# Altium PCB DriveWirePCB.PcbDoc (part 1 of 3)
Units mm, origin at the board's own origin, x right, y up, seen from the top; angles counter-clockwise.
Board outline 57.5 x 124.12 mm, 4 copper layers (Top Layer, GND, PWR, Bottom Layer), stack 1.57 mm thick; 111 components, 71 nets, 388 pads, 260 vias.
Unrouted connection lines stored in the file: 101.
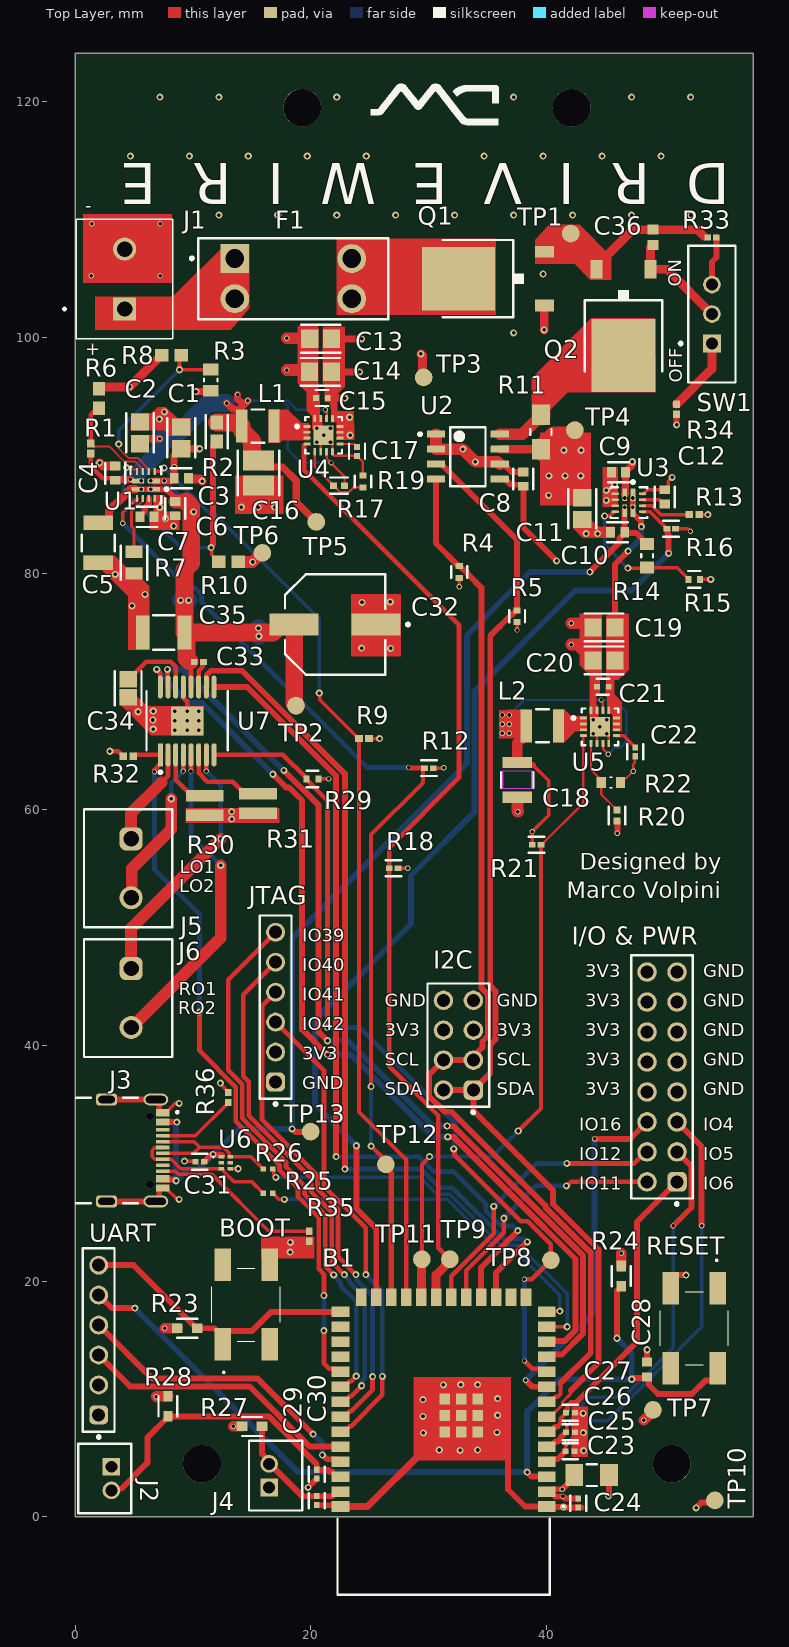
[diagram p0: Top Layer view]
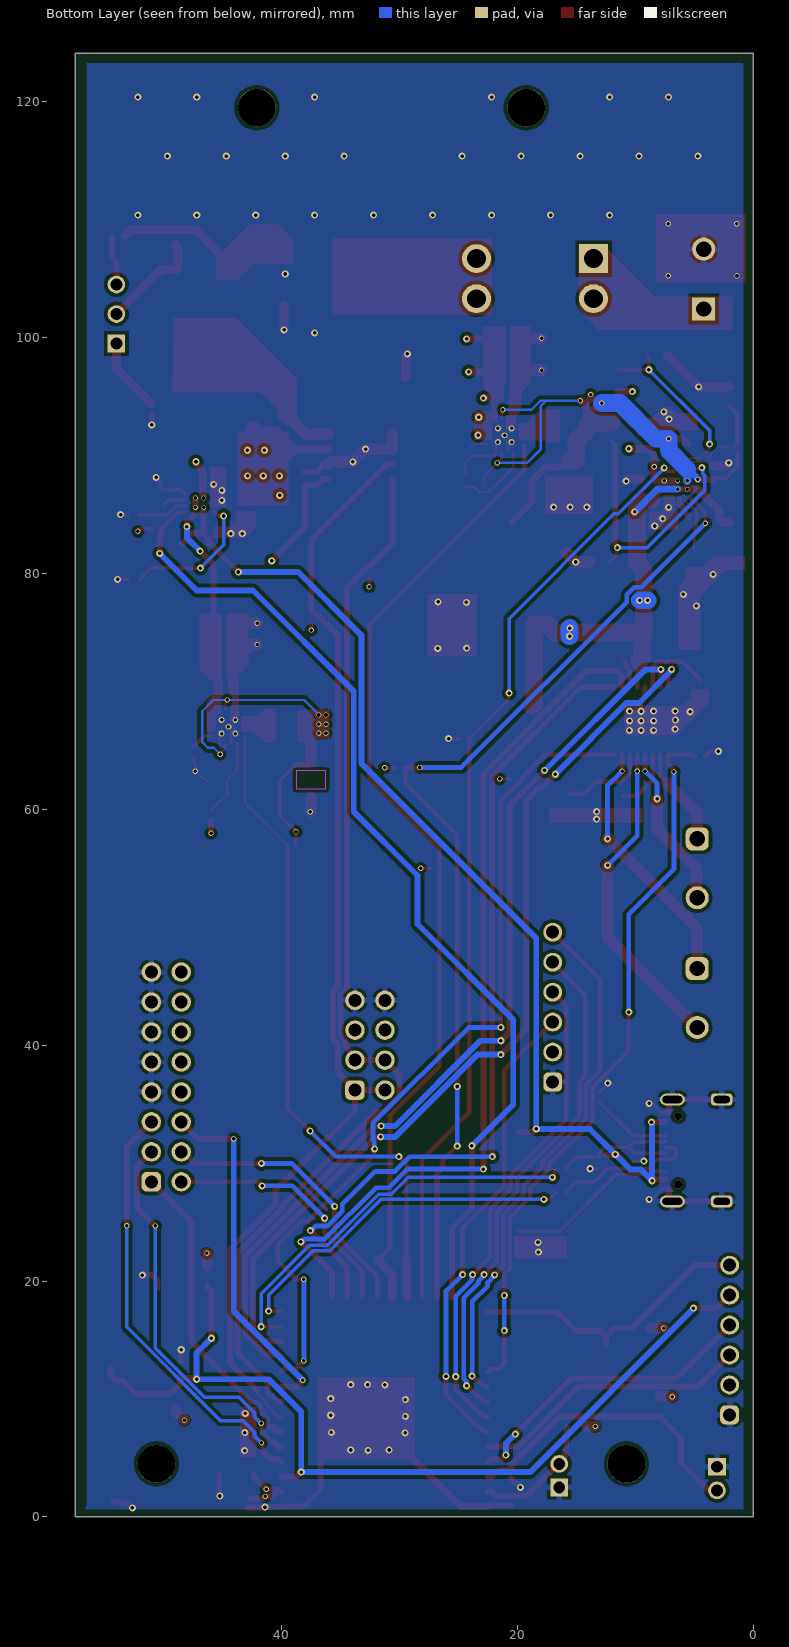
[diagram p1: Bottom Layer view, seen from below]
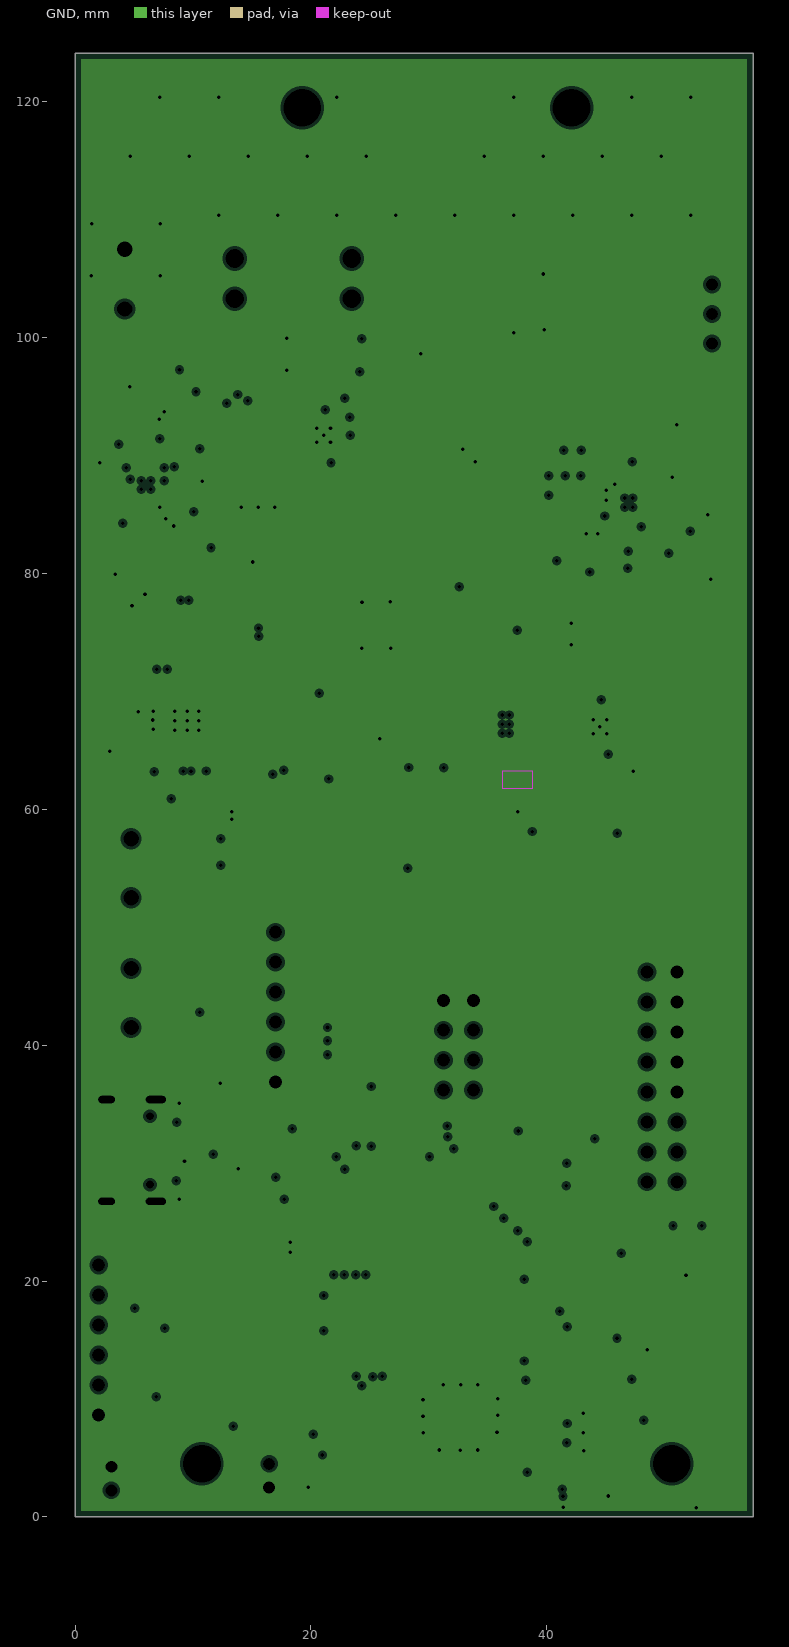
[diagram p2: GND, clearances drawn from the general rule]
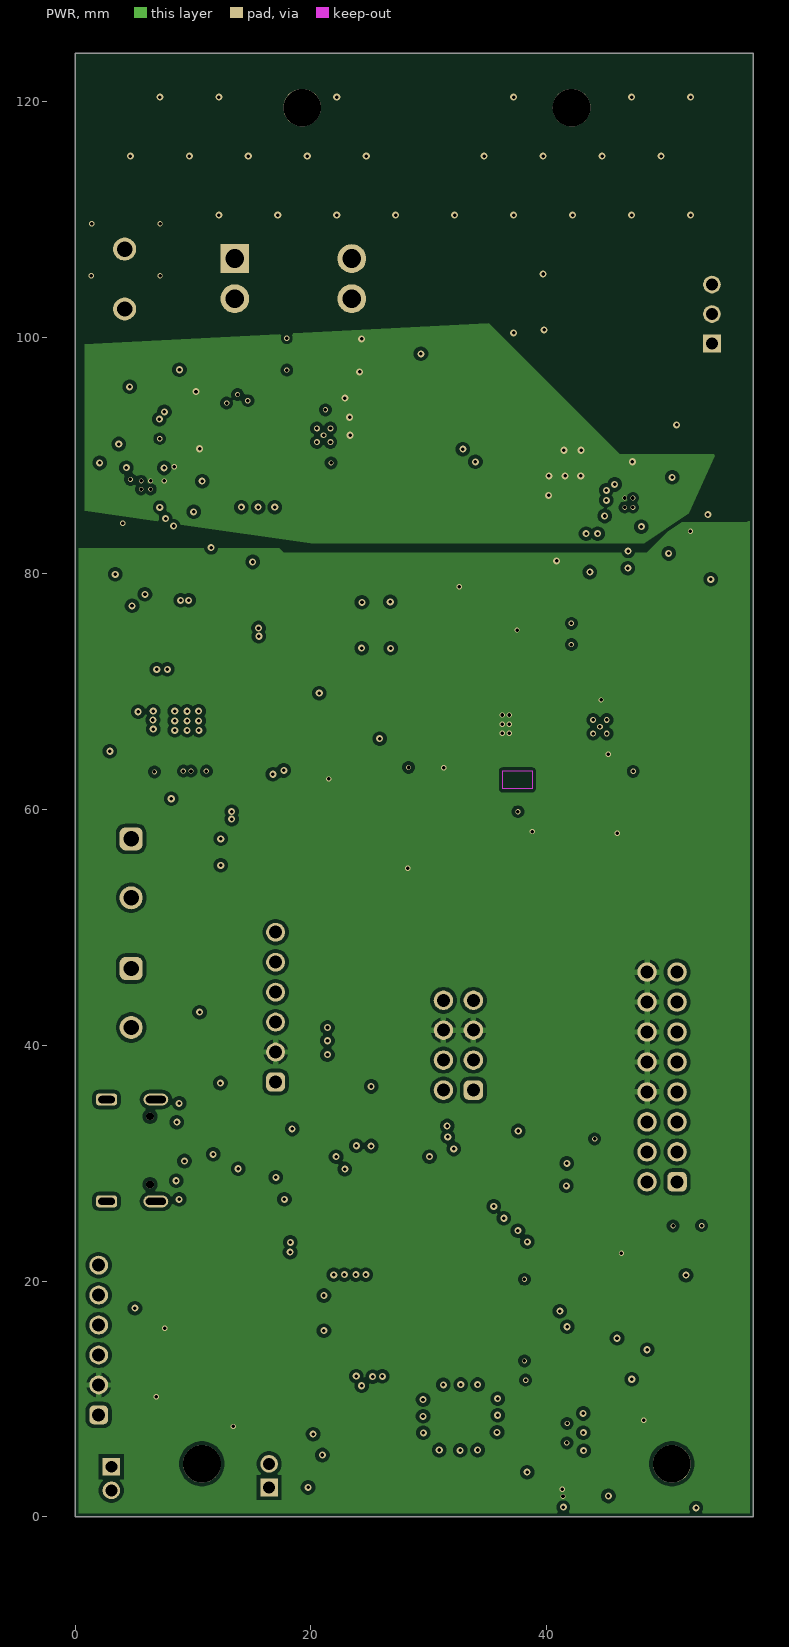
[diagram p3: PWR]
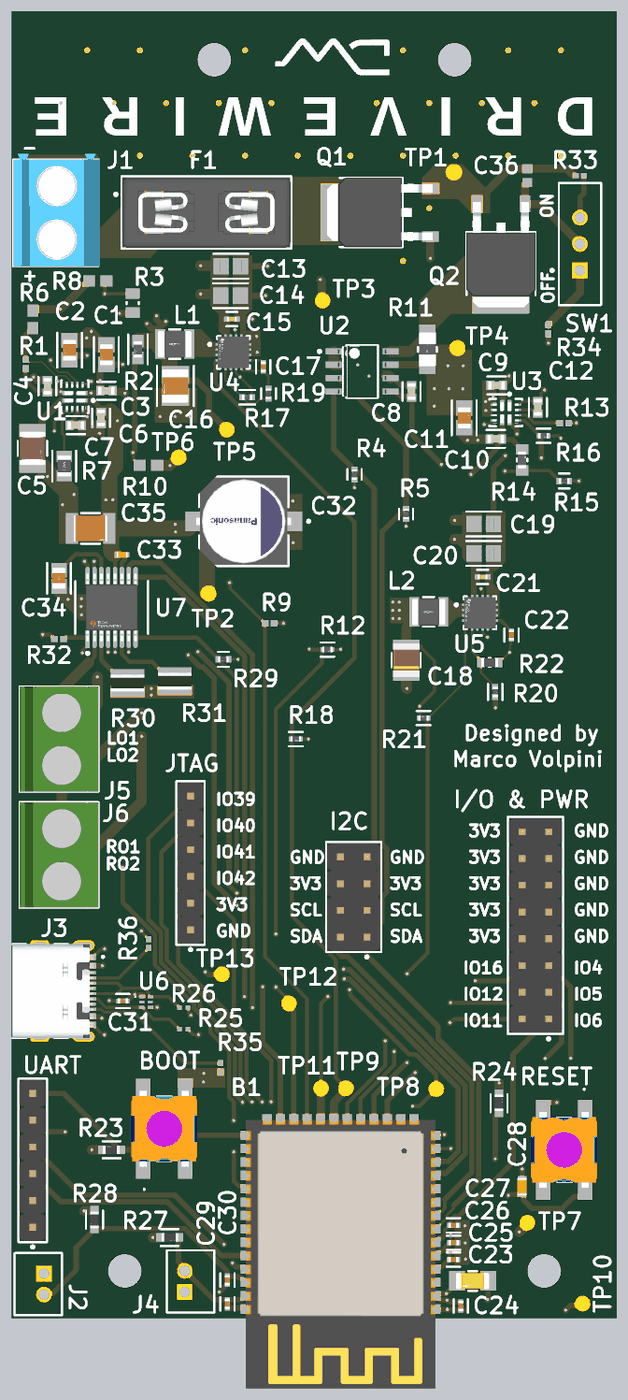
[diagram p5: 3D render of the assembled board from above, using the file's embedded part models]

## Layer stack, top to bottom
Top Solder: solder mask 0.0102, Solder Resist, Dk 3.5
Top Layer: signal copper 0.035
Dielectric 2: prepreg 0.2, PP-006, Dk 4.1
GND: plane copper 0.0175, net GND
Dielectric 1: dielectric 1.065, FR-4, Dk 4.8
PWR: signal copper 0.0175
Dielectric 3: prepreg 0.2, PP-006, Dk 4.1
Bottom Layer: signal copper 0.035
Bottom Solder: solder mask 0.0102, Solder Resist, Dk 3.5

## Board outline
0,0 0,124.125 57.5,124.125 57.5,0

## Design rules (kind name [scope] priority, off if disabled: settings)
BoardOutlineClearance [All] p1: gap=0.3 ignorepadtopadclearanceinfootprint=FALSE
Clearance PourRule [InPolygon] p1: gap=0.3 ignorepadtopadclearanceinfootprint=FALSE
Clearance [All] p2: gap=0.15 ignorepadtopadclearanceinfootprint=TRUE
HoleSize [All] p1: absolutevalues=TRUE maxlimit=6.3 minlimit=0.3 maxpercent=80.000 minpercent=20.000
HoleToHoleClearance [All] p1: gap=0.25 allowstackedmicrovias=TRUE
MinimumAnnularRing MinimumAnnularRing_via [IsVia] p1: minimumring=0.05
MinimumAnnularRing [All] p2: minimumring=0.125
MinimumSolderMaskSliver [All] p1: minsoldermaskwidth=0.1
PlaneClearance [All] p1: clearance=0.25
PlaneConnect PlaneConnect_J1 [InComponent('J1')] p1: planeconnectstyle=Direct reliefexpansion=0.508 reliefentries=4 reliefconductorwidth=0.254 reliefairgap=0.254
PlaneConnect PlaneConnect_vias [IsVia] p2: planeconnectstyle=Direct reliefexpansion=0.508 reliefentries=4 reliefconductorwidth=0.254 reliefairgap=0.254
PlaneConnect [All] p3: planeconnectstyle=Relief reliefexpansion=0.508 reliefentries=4 reliefconductorwidth=0.254 reliefairgap=0.254
PolygonConnect [All] p1: thpad.connectstyle=Relief thpad.reliefconductorwidth=0.5 thpad.reliefentries=4 thpad.polygonreliefangle="90 Angle" thpad.airgapwidth=0.254 smdpad.connectstyle=Direct smdpad.reliefconductorwidth=0.254 smdpad.reliefentries=4 smdpad.polygonreliefangle="90 Angle" smdpad.airgapwidth=0.254 via.connectstyle=Direct via.reliefconductorwidth=0.254 via.reliefentries=4 via.polygonreliefangle="90 Angle" via.airgapwidth=0.254
RoutingVias [All] p1: holewidth=0.3 width=0.6 viastyle="Through Hole" minholewidth=0.2 minwidth=0.45 maxholewidth=0.3 maxwidth=0.6
SilkToSolderMaskClearance [IsPad] p1: minsilkscreentomaskgap=0.15 clearancetoexposedcopper=TRUE
SolderMaskExpansion [All] p1: expansion=0.05 istentingtop=FALSE
SupplyNets "Schematic Supply Nets" [InNet('GND')] p1: voltage=0.000
Width Width_Power [InNetClass('POWER')] p1: maxlimit=5 minlimit=0.2 preferedwidth=1
Width [All] p2: maxlimit=1 minlimit=0.15 preferedwidth=0.5
24 further rules are at their usual default settings.

## Classes and differential pairs
net class POWER: 6V MOTOR_BUS NetJ5_1 NetJ5_2 NetJ6_1 NetJ6_2 NetL1_1 NetR30_1 NetR31_1 VBAT_BUS VBAT_FUSED VBAT_PROTECTED VBAT_RAW VBAT_SWTCH
component class Power: C1 C2 C3 C4 C5 C6 C7 C8 C36 F1 J1 Q1 Q2 R1 R2 R3 R4 R5 R6 R7 R8 R9 R10 R11 R12 R33 R34 SW1 TP1 TP2 TP3 TP4 U1 U2
component class motor_driver: C32 C33 C34 C35 J5 J6 R29 R30 R31 R32 U7
component class logic_power_mux: C9 C10 C11 C12 R13 R14 R15 R16 U3
component class ESP32: B1 BOOT C23 C24 C25 C26 C27 C28 C29 C30 C31 I2C "I/O & PWR" J2 J3 J4 JTAG R23 R24 R25 R26 R27 R28 R35 R36 RESET TP8 TP9 TP10 TP11 TP12 TP13 U6 UART
component class buck_converters: C13 C14 C15 C16 C17 C18 C19 C20 C21 C22 L1 L2 R17 R18 R19 R20 R21 R22 TP5 TP6 TP7 U4 U5

## Components (designator, comment, footprint, x,y, rotation, side; value= is the part's Value field where it differs from the comment)
B1 "ESP32-S3-WROOM-1-N8R8" ESP32-S3-WROOM-1-N8R8 31.25,6.14 r180 top
BOOT "SKHUALE010" SKHUALE010 14.5,18 r90 top (schematic designator X1)
C1 "GRM21BR61H106KE43L" FP-GRM21B-0_2-e0_2_0_7-IPC_A 9,91.5 r270 top
C2 "GRM21BR61H106KE43L" FP-GRM21B-0_2-e0_2_0_7-IPC_A 5.5,91.926 r270 top
C3 "C0603C104K5RACTU" FP-C0603C-CF-MFG 9,88.075 r180 top value="0.10 μF"
C4 "C0603C104K5RACTU" FP-C0603C-CF-MFG 3.4,88.5 r270 top value="0.10 μF"
C5 "EMK325ABJ107MM-T" FP-EMK325A-M-MFG 1.975,82.6 r270 top value=100uF
C6 "C0603C104K5RACTU" FP-C0603C-CF-MFG 8.5,85.5 r90 top value="0.10 μF"
C7 "C0603C104K5RACTU" FP-C0603C-CF-MFG 6.1,84.8 r0 top value="0.10 μF"
C8 "C0603C104K5RACTU" FP-C0603C-CF-MFG 38,88 r90 top value="0.10 μF"
C9 "C0603C104K5RACTU" FP-C0603C-CF-MFG 46.075,88.575 r0 top value="0.10 μF"
C10 "C0603C104K5RACTU" FP-C0603C-CF-MFG 46,83.5 r0 top value="0.10 μF"
C11 "GRM21BR61H106KE43L" FP-GRM21B-0_2-e0_2_0_7-IPC_A 43,85.5 r90 top
C12 "C0603C104K5RACTU" FP-C0603C-CF-MFG 50,86.5 r90 top value="0.10 μF"
C13 "CL21A226KOQNNNG" FP-CL21-IPC_A 20.825,99.9 r180 top
C14 "CL21A226KOQNNNG" FP-CL21-IPC_A 20.8,97.1 r180 top
C15 "CC0402KRX7R7BB104" FP-CC0402-MFG 20.925,94.875 r180 top value="100 nF"
C16 "GRM32ER61C476KE15L" FP-GRM32E-0_3-0_2-IPC_C 15.55,88.525 r270 top
C17 "GCM155R71H103KA55D" FP-GCM155-0_05-IPC_C 23.9,90.35 r270 top
C18 "CL32B226KAJNNNE" CAP_CL32_SAM 37.5,62.5 r90 top
C19 "CL21A226KOQNNNG" FP-CL21-IPC_A 44.85,75.425 r180 top
C20 "CL21A226KOQNNNG" FP-CL21-IPC_A 44.85,72.625 r180 top
C21 "CC0402KRX7R7BB104" FP-CC0402-MFG 44.75,70.4 r180 top value="100 nF"
C22 "GCM155R71H103KA55D" FP-GCM155-0_05-IPC_C 47.5,64.879 r270 top
C23 "CL31B226KPHNNNE" FP-CL31-IPC_A 43.801,3.55 r180 top
C24 "CL05B104KP5NNNC" FP-CL17-IPC_C 42.675,1.175 r90 top
C25 "CL05B104KP5NNNC" FP-CL17-IPC_C 41.975,5.575 r0 top
C26 "CL05B104KP5NNNC" FP-CL17-IPC_C 42,7.175 r0 top
C27 "CL05B104KP5NNNC" FP-CL17-IPC_C 41.996,8.825 r0 top
C28 "GRM188R61A105KA61D" CAPC1608X90X35LL10T15 48.5,12.5 r270 top
C29 "CL05B104KP5NNNC" FP-CL17-IPC_C 20.5,1.379 r90 top
C30 "CL05B104KP5NNNC" FP-CL17-IPC_C 20.5,3.621 r90 top
C31 "CL05B104KP5NNNC" FP-CL17-IPC_C 10.571,30.125 r180 top
C32 "25SVPF100M" FP-OS-CON-SMT-E7-MFG 22.05,75.675 r180 top
C33 "GRM155R71C103KA01D" CAPC1005X55X25LL05T10 10.5,72.5 r180 top
C34 "C2012X7R1H225K125AC" FP-C2012-125-0_2-IPC_B 4.5,70.264 r270 top
C35 "C3225X7R1E226M250AB" FP-C3225-250-0_4-IPC_A 7.5,75 r0 top
C36 "C0603C105K4RACTU" CAPC1608X90X35LL15T15 49,108.5 r90 top
F1 "3568" FP-3568-MFG 18.5,105 r0 top
I2C "61300821121" 61300821121 32.5,40 r90 top (schematic designator P2)
"I/O & PWR" "61301621121" 61301621121 49.77,37.31 r90 top (schematic designator P4)
J1 "TB006-508-02BE" CUI_TB006-508-02BE 4.2,102.425 r90 top
J2 "B2B-PH-K-S(LF)(SN)" JST-B2B-PH-K-S_V 2.525,3.25 r270 top
J3 "USB4105-GF-A-120" GCT_USB4105-GF-A-120 2.67,31.075 r270 top
J4 "B2B-PH-K-S(LF)(SN)" JST-B2B-PH-K-S_V 17,3.5 r90 top
J5 "691137710002" 691137710002 4.5,55 r270 top
J6 "691137710002" 691137710002 4.5,44 r270 top
JTAG "61300611121" 61300611121 17,43.23 r90 top (schematic designator P3)
L1 "DFE322520F-2R2M=P2" FP-DFE322520F-MFG 15.5,92.5 r180 top
L2 "DFE322520F-2R2M=P2" FP-DFE322520F-MFG 39.625,67.075 r180 top
Q1 "AOD4185" TO252 35,105 r90 top
Q2 "AOD4185" TO252 46.5,101 r180 top
R1 "RK73H1ETTP3013F" RESC1005X40X25NL10T10 1.325,90.6 r270 top
R2 "RMCF0603FG102K" FP-RMCF0603-IPC_A 12,92 r270 top
R3 "RC0805FR-07402KL" RESC2013X60X35NL10T20 11.5,96.4 r270 top
R4 "RC0402FR-0720KL" FP-RC0402-0_4-MFG 32.575,80.125 r90 top
R5 "RC0402FR-0720KL" FP-RC0402-0_4-MFG 37.475,76.375 r90 top
R6 "TNPU060349K9BZEN00" RESC1609X55X30ML10T20 2.025,94.85 r270 top
R7 "RN73R2ATTD2982B50" FP-RN73R2A-IPC_B 5,80.925 r90 top
R8 "TNPU060349K9BZEN00" RESC1609X55X30ML10T20 8.175,98.5 r0 top
R9 "RK73H1ETTP1003F" RESC1005X40X25NL10T10 24.5,66 r180 top
R10 "TNPU060349K9BZEN00" RESC1609X55X30ML10T20 13,81 r180 top
R11 "ERJ8CWFR020V" FP-ERJ8CW-MFG 39.5,92 r270 top
R12 "RMCF0402FT10K0" FP-RMCF0402-IPC_C 30,63.5 r0 top
R13 "RK73H1ETTP1003F" RESC1005X40X25NL10T10 52.5,85 r180 top
R14 "RG1608P-273-B-T5" FP-RG1608-MFG 48.5,81.5 r90 top
R15 "RT0402BRD0710KL" FP-RT0402-MFG 52.5,79.5 r180 top value=10KΩ
R16 "RMCF0402FT10K0" FP-RMCF0402-IPC_C 50.541,83.8 r0 top
R17 "RN73R1ETTP1303B25" FP-RN73R1E-IPC_B 22.375,87.45 r180 top
R18 "RMCF0402FT10K0" FP-RMCF0402-IPC_C 27,55 r0 top
R19 "RT0402BRD0720KL" FP-RT0402-MFG 24.4,87.8 r90 top value=20KΩ
R20 "RN73R1ETTP1303B25" FP-RN73R1E-IPC_B 45.95,59.475 r90 top
R21 "RMCF0402FT10K0" FP-RMCF0402-IPC_C 39.134,57 r180 top
R22 "RT0603BRD0741K7L" RESC1608X55N 45.425,62.275 r180 top
R23 "RT0603BRD0710KL" FP-RT0603-MFG 9.5,16 r180 top value=10KΩ
R24 "RT0603BRD0710KL" FP-RT0603-MFG 46.3,20.425 r90 top value=10KΩ
R25 "CRCW040222R0FKED" RESC1005X40X25LL05T05 16.35,27.45 r0 top
R26 "CRCW040222R0FKED" RESC1005X40X25LL05T05 16.35,29.5 r0 top
R27 "RT0603BRD0710KL" FP-RT0603-MFG 15,7.675 r0 top value=10KΩ
R28 "RT0603BRD0710KL" FP-RT0603-MFG 7.875,9.375 r270 top value=10KΩ
R29 "RT0402BRD0710KL" FP-RT0402-MFG 20.125,62.575 r0 top value=10KΩ
R30 "ERJB2CFR12V" RES_ERJB2CFR12V 11,60.325 r270 top
R31 "ERJB2CFR12V" RES_ERJB2CFR12V 15.5,60.5 r270 top
R32 "RK73H1ETTP1003F" RESC1005X40X25NL10T10 4.5,64.5 r0 top
R33 "RK73H1ETTP1001F" RESC1005X40X25LL10T10 54,108.5 r180 top
R34 "RK73H1ETTP1003F" RESC1005X40X25NL10T10 51,93.925 r90 top
R35 "RC0402FR-075K1L" RESC1005X40X25NL05T10 19.85,23.8 r270 top
R36 "RC0402FR-075K1L" RESC1005X40X25NL05T10 13,35.575 r90 top
RESET "SKHUALE010" SKHUALE010 52.5,16 r270 top (schematic designator X2)
SW1 "EG1218" ESWI-EG1218_V 54,102 r90 top
TP1 "TestPoint" TestPoint 42.025,108.825 r0 top
TP2 "TestPoint" TestPoint 18.725,68.8 r0 top
TP3 "TestPoint" TestPoint 29.55,96.625 r0 top
TP4 "TestPoint" TestPoint 42.375,92.15 r0 top
TP5 "TestPoint" TestPoint 20.45,84.375 r0 top
TP6 "TestPoint" TestPoint 15.875,81.75 r0 top
TP7 "TestPoint" TestPoint 49,9.075 r0 top
TP8 "TestPoint" TestPoint 40.35,21.775 r0 top
TP9 "TestPoint" TestPoint 31.775,21.85 r0 top
TP10 "TestPoint" TestPoint 54.25,1.4 r90 top
TP11 "TestPoint" TestPoint 29.4,21.85 r90 top
TP12 "TestPoint" TestPoint 26.35,29.9 r90 top
TP13 "TestPoint" TestPoint 19.975,32.675 r90 top
U1 "TPS2121RUXR" FP-RUX0012A-MFG 6,87.5 r180 top
U2 "INA219BIDR" FP-D0008A-MFG 33.3,89.905 r0 top
U3 "TPS2121RUXR" FP-RUX0012A-MFG 46.95,86 r270 top
U4 "TPS62130ARGTR" FP-RGT0016C-MFG 21.075,91.725 r0 top
U5 "TPS62130ARGTR" FP-RGT0016C-MFG 44.5,67 r0 top
U6 "TPD2E001DRYR" DRY0006A 12.77,30.025 r0 top
U7 "DRV8833PWPR" FP-PWP0016C-IPC_A 9.5,67.5 r90 top
UART "61300611121" 61300611121 2,15 r90 top (schematic designator P1)

## Footprints (in the part's own frame and the unit in brackets; to place one, negate y for a bottom-side part, rotate by r counter-clockwise, add the part's x,y. Pads: shape width x height; smd on the part's side, far side on the other; paste and mask are expansions set on the pad)
61300611121 [mm] "Pin Header, pitch 2.54 mm, THT, Vertical, single row, 6p"
  rrect50% 1.6x1.6 hole 1.1: 1(-6.35,0)
  round 1.6 hole 1.1: 2(-3.81,0) 3(-1.27,0) 4(1.27,0) 5(3.81,0) 6(6.35,0)
  silkscreen extent -8.34,-1.35 7.77,1.35, body extent -7.62,-1.27 7.62,1.27, height 8.57
61300821121 [mm] "Pin Header, pitch 2.54 mm, THT, Vertical, dual row, 8p"
  rrect50% 1.65x1.65 hole 1.1: 1(-3.81,-1.27)
  round 1.65 hole 1.1: 2(-3.81,1.27) 3(-1.27,-1.27) 4(-1.27,1.27) 5(1.27,-1.27) 6(1.27,1.27) 7(3.81,-1.27) 8(3.81,1.27)
  silkscreen extent -5.81,-2.62 5.23,2.62, body extent -5.08,-2.54 5.08,2.54, height 8.59
61301621121 [mm] "Pin Header, pitch 2.54 mm, THT, Vertical, dual row, 16p"
  rrect50% 1.65x1.65 hole 1.1: 1(-8.89,-1.27)
  round 1.65 hole 1.1: 2(-8.89,1.27) 3(-6.35,-1.27) 4(-6.35,1.27) 5(-3.81,-1.27) 6(-3.81,1.27) 7(-1.27,-1.27) 8(-1.27,1.27) 9(1.27,-1.27) 10(1.27,1.27) 11(3.81,-1.27) 12(3.81,1.27) 13(6.35,-1.27) 14(6.35,1.27) 15(8.89,-1.27) 16(8.89,1.27)
  silkscreen extent -10.89,-2.62 10.31,2.62, body extent -10.16,-2.54 10.16,2.54, height 8.59
691137710002 [mm] "Horizontal Cable Entry with Pressure Clamp, pitch 5mm, 02p"
  rrect50% 1.95x1.95 hole 1.3: 1(-2.5,0.25)
  round 1.95 hole 1.3: 2(2.5,0.25)
  silkscreen extent -5,-3.75 5,3.75, body extent -5,-3.75 5,3.75, height 11.6
CAP_CL32_SAM [mm]
  rect 0.956x2.5 smd paste+0 mask+0: 1(-1.478,0) 2(1.478,0)
  Top Layer keep-out region: -0.762,-1.199 -0.762,1.199 0.762,1.199 0.762,-1.199
  Keep-Out Layer region: -0.762,-1.25 -0.762,1.25 0.762,1.25 0.762,-1.25
  silkscreen extent -0.69,-1.38 0.69,1.38, body extent -1.6,-1.25 1.6,1.25, height 1
CAPC1005X55X25LL05T10 [mm] "Chip Capacitor, 2-Leads, Body 1.05x0.55mm, IPC High Density"
  rect 0.56x0.52 smd: 1(-0.39,0) 2(0.39,0)
  body extent -0.53,-0.28 0.53,0.28, height 0.55
CAPC1608X90X35LL10T15 [mm] "Chip Capacitor, 2-Leads, Body 1.7x0.9mm, IPC High Density"
  rect 0.75x0.85 smd: 1(-0.625,0) 2(0.625,0)
  body extent -0.85,-0.45 0.85,0.45, height 0.9
CAPC1608X90X35LL15T15 [mm] "Chip Capacitor, 2-Leads, Body 1.60x0.81mm, IPC High Density"
  rect 0.85x0.9 smd: 1(-0.65,0) 2(0.65,0)
  body extent -0.88,-0.48 0.87,0.48, height 0.9
CUI_TB006-508-02BE [mm]
  rect 1.95x1.95 / inner round 1.95 / far side rect 1.95x1.95 hole 1.3: 1(0,0)
  round 1.95 hole 1.3: 2(5.08,0)
  silkscreen extent -2.54,-4.1 7.62,5.2, body extent -2.54,-4.19 8.12,4.01, height 10
DRY0006A [mm] "SON, 6-Leads, Body 1.45x1mm, Pitch 0.5mm"
  rrect33% 0.52x0.3 smd: 1(-0.37,0.5)
  rrect33% 0.49x0.3 smd: 2(-0.385,0) 3(-0.385,-0.5) 4(0.385,-0.5) 5(0.385,0) 6(0.385,0.5)
  silkscreen extent -1.08,0.45 -0.98,0.55, body extent -0.5,-0.72 0.5,0.72, height 0.6
ESP32-S3-WROOM-1-N8R8 [mm]
  rect 1.5x0.9 smd: 1(-8.75,5.26) 2(-8.75,3.99) 3(-8.75,2.72) 4(-8.75,1.45) 5(-8.75,0.18) 6(-8.75,-1.09) 7(-8.75,-2.36) 8(-8.75,-3.63) 9(-8.75,-4.9) 10(-8.75,-6.17) 11(-8.75,-7.44) 12(-8.75,-8.71) 13(-8.75,-9.98) 14(-8.75,-11.25) 27(8.75,-11.25) 28(8.75,-9.98) 29(8.75,-8.71) 30(8.75,-7.44) 31(8.75,-6.17) 32(8.75,-4.9) 33(8.75,-3.63) 34(8.75,-2.36) 35(8.75,-1.09) 36(8.75,0.18) 37(8.75,1.45) 38(8.75,2.72) 39(8.75,3.99) 40(8.75,5.26)
  rect 0.9x1.5 smd: 15(-6.985,-12.5) 16(-5.715,-12.5) 17(-4.445,-12.5) 18(-3.175,-12.5) 19(-1.905,-12.5) 20(-0.635,-12.5) 21(0.635,-12.5) 22(1.905,-12.5) 23(3.175,-12.5) 24(4.445,-12.5) 25(5.715,-12.5) 26(6.985,-12.5)
  rect 0.9x0.9 smd: 41(-1.5,-2.46) 42(-1.5,-1.06) 43(-2.9,-1.06) 44(-2.9,-2.46) 45(-2.9,-3.86) 46(-1.5,-3.86) 47(-0.1,-3.86) 48(-0.1,-2.46) 49(-0.1,-1.06)
  silkscreen extent -10.2,5.21 9,12.75, body extent -9.02,-12.7 8.98,12.8, height 3.1
ESWI-EG1218_V [mm] "THD, 3-Leads, Body 11.6x4mm, Pitch 2.5mm"
  rect 1.5x1.5 hole 1: 1(-2.5,0)
  round 1.5 hole 1: 2(0,0) 3(2.5,0)
  silkscreen extent -5.8,-2 5.8,2.77, body extent -5.8,-2 5.8,2, height 7.4
FP-3568-MFG [mm]
  round 2.45 hole 1.6 paste-2539.97 mask+0: 1(-4.96,-1.7) 2(4.96,-1.7) 2(4.96,1.7)
  rect 2.45x2.45 hole 1.6 paste-2539.97 mask+0: 1(-4.96,1.7)
  silkscreen extent -8.72,-3.43 8.07,3.43, body extent -8.17,-3.53 8.17,3.53, height 0.25
FP-C0603C-CF-MFG [mm]
  rect 0.75x0.9 smd paste+0 mask+0: 1(-0.6,0) 2(0.6,0)
  silkscreen extent -0.87,-0.85 0.88,0.85, body extent -1.2,-0.6 1.2,0.6, height 0.25
FP-C2012-125-0_2-IPC_B [mm]
  rect 1.378x1.456 smd paste+0 mask+0: 1(-0.764,0) 2(0.764,0)
  silkscreen extent -1.45,-1.13 1.45,1.13, body extent -1.7,-0.98 1.7,0.98, height 0.25
FP-C3225-250-0_4-IPC_A [mm]
  rect 1.153x2.904 smd paste+0 mask+0: 1(-1.775,0) 2(1.775,0)
  silkscreen extent -0.9,-1.45 0.9,1.45, body extent -2.85,-1.95 2.85,1.95, height 0.25
FP-CC0402-MFG [mm]
  rect 0.5x0.5 smd paste+0 mask+0: 1(-0.5,0) 2(0.5,0)
  silkscreen extent -0.53,-0.68 0.53,0.67, body extent -0.87,-0.48 0.87,0.48, height 0.25
FP-CL17-IPC_C [mm]
  rect 0.515x0.472 smd paste+0 mask+0: 1(-0.379,0) 2(0.379,0)
  silkscreen extent -0.64,-0.67 0.64,0.67, body extent -0.74,-0.38 0.74,0.38, height 0.25
FP-CL21-IPC_A [mm]
  rect 1.455x1.556 smd paste+0 mask+0: 1(-0.926,0) 2(0.926,0)
  silkscreen extent -1.65,-1.18 1.65,1.18, body extent -2.15,-1.28 2.15,1.28, height 0.25
FP-CL31-IPC_A [mm]
  rect 1.505x1.858 smd paste+0 mask+0: 1(-1.476,0) 2(1.476,0)
  silkscreen extent -0.42,-0.93 0.42,0.93, body extent -2.73,-1.43 2.73,1.43, height 0.25
FP-D0008A-MFG [mm]
  rrect17% 1.55x0.6 smd paste+0 mask+0: 1(-2.7,1.905) 2(-2.7,0.635) 3(-2.7,-0.635) 4(-2.7,-1.905) 5(2.7,-1.905) 6(2.7,-0.635) 7(2.7,0.635) 8(2.7,1.905)
  silkscreen extent -4.17,-2.5 1.5,2.5, body extent -3.57,-2.75 3.57,2.75, height 0.25
FP-DFE322520F-MFG [mm]
  rect 0.95x2.8 smd paste+0 mask+0: 1(-1.375,0) 2(1.375,0)
  silkscreen extent -0.53,-1.4 0.53,1.4, body extent -1.95,-1.5 1.95,1.5, height 0.25
FP-EMK325A-M-MFG [mm]
  rect 1.25x2.5 smd paste+0 mask+0: 1(-1.7,0) 2(1.7,0)
  silkscreen extent -0.7,-1.4 0.7,1.4, body extent -2.42,-1.5 2.42,1.5, height 0.25
FP-ERJ8CW-MFG [mm]
  rect 1.75x1.55 smd paste+0 mask+0: 1(-1.475,0) 2(1.475,0)
  silkscreen extent -0.23,-0.9 0.23,0.9, body extent -2.45,-1 2.45,1, height 0.25
FP-GCM155-0_05-IPC_C [mm]
  rect 0.515x0.472 smd paste+0 mask+0: 1(-0.379,0) 2(0.379,0)
  silkscreen extent -0.64,-0.67 0.64,0.67, body extent -0.74,-0.38 0.74,0.38, height 0.25
FP-GRM21B-0_2-e0_2_0_7-IPC_A [mm]
  rect 1.455x1.556 smd paste+0 mask+0: 1(-0.926,0) 2(0.926,0)
  silkscreen extent -1.65,-1.18 1.65,1.18, body extent -2.15,-1.28 2.15,1.28, height 0.25
FP-GRM32E-0_3-0_2-IPC_C [mm]
  rect 1.703x2.606 smd paste+0 mask+0: 1(-1.051,0) 2(1.051,0)
  silkscreen extent -1.9,-1.75 1.9,1.75, body extent -2,-1.45 2,1.45, height 0.25
FP-OS-CON-SMT-E7-MFG [mm]
  rect 4.15x1.9 smd paste+0 mask+0: 1(-3.475,0) 2(3.475,0)
  silkscreen extent -6.3,-4.25 4.25,4.25, body extent -5.8,-4.5 5.8,4.5, height 0.25
FP-PWP0016C-IPC_A [mm]
  rect 1.955x0.421 smd paste+0 mask+0: 1(-2.875,2.275)
  rrect100% 1.955x0.421 smd paste+0 mask+0: 2(-2.875,1.625) 3(-2.875,0.975) 4(-2.875,0.325) 5(-2.875,-0.325) 6(-2.875,-0.975) 7(-2.875,-1.625) 8(-2.875,-2.275) 9(2.875,-2.275) 10(2.875,-1.625) 11(2.875,-0.975) 12(2.875,-0.325) 13(2.875,0.325) 14(2.875,0.975) 15(2.875,1.625) 16(2.875,2.275)
  rect 2.46x2.77 smd paste-1000 mask+0: 17(0,0)
  silkscreen extent -4.48,-3.45 2.5,3.45, body extent -4.35,-3 4.35,3, height 0.25
FP-RC0402-0_4-MFG [mm]
  rect 0.5x0.6 smd paste+0 mask+0: 1(-0.5,0) 2(0.5,0)
  silkscreen extent -0.5,-0.67 0.5,0.67, body extent -0.85,-0.4 0.85,0.4, height 0.25
FP-RG1608-MFG [mm]
  rect 1x1.2 smd paste+0 mask+0: 1(-1,0) 2(1,0)
  silkscreen extent -0.13,-0.5 0.13,0.5, body extent -1.6,-0.7 1.6,0.7, height 0.25
FP-RGT0016C-MFG [mm]
  rrect42% 0.6x0.24 smd paste+0 mask+0: 1(-1.4,0.75) 2(-1.4,0.25) 3(-1.4,-0.25) 4(-1.4,-0.75) 9(1.4,-0.75) 10(1.4,-0.25) 11(1.4,0.25) 12(1.4,0.75)
  rrect42% 0.24x0.6 smd paste+0 mask+0: 5(-0.75,-1.4) 6(-0.25,-1.4) 7(0.25,-1.4) 8(0.75,-1.4) 13(0.75,1.4) 14(0.25,1.4) 15(-0.25,1.4) 16(-0.75,1.4)
  rrect6% 1.68x1.68 smd paste-1000 mask+0: 17(0,0)
  silkscreen extent -2.37,-1.55 1.55,1.55, body extent -1.8,-1.8 1.8,1.8, height 0.25
FP-RMCF0402-IPC_C [mm]
  rect 0.581x0.472 smd paste+0 mask+0: 1(-0.366,0) 2(0.366,0)
  silkscreen extent -0.66,-0.67 0.66,0.67, body extent -0.76,-0.38 0.76,0.38, height 0.25
FP-RMCF0603-IPC_A [mm]
  rect 1.206x1.058 smd paste+0 mask+0: 1(-0.801,0) 2(0.801,0)
  silkscreen extent -1.4,-0.93 1.4,0.93, body extent -1.9,-1.03 1.9,1.03, height 0.25
FP-RN73R1E-IPC_B [mm]
  rect 0.588x0.572 smd paste+0 mask+0: 1(-0.464,0) 2(0.464,0)
  silkscreen extent -0.76,-0.69 0.76,0.69, body extent -0.91,-0.44 0.91,0.44, height 0.25
FP-RN73R2A-IPC_B [mm]
  rect 1.055x1.456 smd paste+0 mask+0: 1(-0.925,0) 2(0.925,0)
  silkscreen extent -1.45,-1.13 1.45,1.13, body extent -1.7,-0.98 1.7,0.98, height 0.25
FP-RT0402-MFG [mm]
  rect 0.5x0.6 smd paste+0 mask+0: 1(-0.5,0) 2(0.5,0)
  silkscreen extent -0.5,-0.71 0.5,0.7, body extent -0.85,-0.4 0.85,0.4, height 0.25
FP-RT0603-MFG [mm]
  rect 0.9x0.8 smd paste+0 mask+0: 1(-0.85,0) 2(0.85,0)
  silkscreen extent -0.85,-0.81 0.86,0.8, body extent -1.4,-0.55 1.4,0.55, height 0.25
FP-RUX0012A-MFG [mm]
  rrect25% 1.05x0.4 smd paste+0 mask+0: 1(-0.675,0.35) 2(-0.675,-0.35) 7(0.675,-0.35) 8(0.675,0.35)
  rrect50% 0.2x0.6 smd paste+0 mask+0: 3(-0.75,-1.15) 4(-0.25,-1.15) 5(0.25,-1.15) 6(0.75,-1.15) 9(0.75,1.15) 10(0.25,1.15) 11(-0.25,1.15) 12(-0.75,1.15)
  silkscreen extent -1.88,-1.55 1.3,1.55, body extent -1.3,-1.55 1.3,1.55, height 0.25
GCT_USB4105-GF-A-120 [mm]
  rect 0.6x1.15 smd: A1_B12(-3.2,4.755) A4_B9(-2.4,4.755) B1_A12(3.2,4.755) B4_A9(2.4,4.755)
  rect 0.3x1.15 smd: A5(-1.25,4.755) A6(-0.25,4.755) A7(0.25,4.755) A8(1.25,4.755) B5(1.75,4.755) B6(0.75,4.755) B7(-0.75,4.755) B8(-1.75,4.755)
  oval 1x2.1 hole 0.6 slot 1.7 at 90 deg: SH1(-4.32,4.18) SH2(4.32,4.18)
  rrect50% 1x1.8 hole 0.6 slot 1.4 at 90 deg: SH3(-4.32,0) SH4(4.32,0)
  round 0.65 hole 0.65 unplated: ""(-2.89,3.68) ""(2.89,3.68)
  silkscreen extent -4.47,-2.6 4.47,6.1, body extent -4.47,-2.6 4.47,5.11, height 3.31
JST-B2B-PH-K-S_V [mm] "Connector, 2-Leads, Body 5.9x4.5mm, Pitch 2mm"
  rect 1.5x1.5 hole 1: 1(-1,0.55)
  round 1.5 hole 1: 2(1,0.55)
  silkscreen extent -2.95,-2.25 2.95,2.25, body extent -2.95,-2.25 2.95,2.25, height 6
RES_ERJB2CFR12V [mm]
  rect 0.95x3.2 smd: 1(-0.825,0) 2(0.825,0)
  body extent -0.8,-1.6 0.8,1.6, height 0.67
RESC1005X40X25LL05T05 [mm] "Chip Resistor, 2-Leads, Body 1.00x0.50mm, IPC High Density"
  rect 0.45x0.45 smd: 1(-0.4,0) 2(0.4,0)
  body extent -0.53,-0.27 0.53,0.28, height 0.4
RESC1005X40X25LL10T10 [mm] "Chip Resistor, 2-Leads, Body 1.00x0.50mm, IPC High Density"
  rect 0.55x0.5 smd: 1(-0.375,0) 2(0.375,0)
  body extent -0.55,-0.3 0.55,0.3, height 0.4
RESC1005X40X25NL05T10 [mm] "Chip Resistor, 2-Leads, Body 1.00x0.50mm, IPC Medium Density"
  rect 0.6x0.55 smd: 1(-0.425,0) 2(0.425,0)
  body extent -0.53,-0.27 0.53,0.28, height 0.4
RESC1005X40X25NL10T10 [mm] "Chip Resistor, 2-Leads, Body 1.00x0.50mm, IPC Medium Density"
  rect 0.65x0.6 smd: 1(-0.425,0) 2(0.425,0)
  body extent -0.55,-0.3 0.55,0.3, height 0.4
RESC1608X55N [mm]
  rect 0.79x0.93 smd paste+0 mask+0.102: 1(-0.82,0) 2(0.82,0)
  silkscreen extent -0.11,-0.45 0.11,0.45, body extent -0.8,-0.4 0.8,0.4, height 0.55
RESC1609X55X30ML10T20 [mm] "Chip Resistor, 2-Leads, Body 1.60x0.85mm, IPC Low Density"
  rect 1.15x1.05 smd: 1(-0.825,0) 2(0.825,0)
  body extent -0.85,-0.48 0.85,0.48, height 0.55
RESC2013X60X35NL10T20 [mm] "Chip Resistor, 2-Leads, Body 2.00x1.25mm, IPC Medium Density"
  rect 1x1.35 smd: 1(-0.9,0) 2(0.9,0)
  silkscreen extent -0.1,-0.58 0.1,0.58, body extent -1.05,-0.67 1.05,0.67, height 0.6
SKHUALE010 [mm]
  rect 2.75x1.4 smd: 1(-3.375,2) 2(3.375,2) 3(-3.375,-2) 4(3.375,-2)
  silkscreen extent -5.8,-2.9 3.1,2.9, body extent -3.6,-3.15 3.6,3.15, height 2.51
TestPoint [mm]
  round 1.5 smd paste-2539.97: 1(0,0)
TO252 [mm]
  rect 1x1.6 smd: 1(-2.28,-4.8) 2(2.28,-4.8)
  rect 5.4x6.2 smd: 3(0,2.5)
  silkscreen extent -3.28,-3.02 3.28,3.84, body extent -3.3,-5.02 3.3,5.02, height 2.4

## Part data
B1: "WiFi Modules - 802.11 (Engineering Samples Only) SMD Module, ESP32-S3R8 with 8 MB Octal PSRAM Die, 8 MB Quad SPI flash, PCB Antenna", Manufacturer_Name="Espressif Systems", Mouser Part Number=356-EP32S3WROOM1N8R8, Datasheet Link=https://www.espressif.com/sites/default/files/documentation/esp32-s3-wroom-1_wroom-1u_datasheet_en.pdf, Geometry.Height=3.25mm, Manufacturer_Part_Number=ESP32-S3-WROOM-1-N8R8, Mouser Price/Stock=https://www.mouser.co.uk/ProductDetail/Espressif-Systems/ESP32-S3-WROOM-1-N8R8?qs=7D1LtPJG0i3%2F28hKFavOpQ%3D%3D, Supplier 1=Mouser, Supplier Part Number 1=356-EP32S3WROOM1N8R8
BOOT RESET: "Tactile Switches 6.0x6.0x2.5mm 160gf", Manufacturer_Name="ALPS Electric", Mouser Part Number=688-SKHUALE010, Arrow Part Number=SKHUALE010, Arrow Price/Stock=https://www.arrow.com/en/products/skhuale010/alpsalpine.html?utm_currency=USD&region=asia, Datasheet Link=http://www.alps.com/prod/info/J/HTML/Tact/SurfaceMount/SKHU/SKHUALE010.html#3DCAD, Geometry.Height=2.7mm, Manufacturer_Part_Number=SKHUALE010, Mouser Price/Stock=https://www.mouser.co.uk/ProductDetail/Alps-Alpine/SKHUALE010?qs=4aVxpR%2FL9VJG%2FCZy8DqWaA%3D%3D, Supplier 1=Newark, Supplier Part Number 1=SKHUALE010
C1 C2 C11: library part CMP-06035-004402-1, "Chip Multilayer Ceramic Capacitors for General Purpose, 0805, 10uF, X5R, 15%, 10%, 50V", Capacitance=10uF, Dielectric=X5R, Tolerance=10%, Voltage Rating (DC)=50V, Length=2mm, Thickness=1.25mm, Width=1.25mm
C3 C4 C6 C7 C8 C9 C10 C12: library part CMP-2006-03061-2, "CAP CER 0.1UF 50V X7R 0603", Capacitance="0.10 μF", Manufacturer=KEMET, Package=C0603C-CF, Temperature="-55°C to +125°C", Temperature Characteristic=X7R, Temperature Coefficient=30ppm/°C, Temperature Range High=+125°C, Temperature Range Low=-55°C, Tolerance=0.1, Voltage Rating="50 V", Automotive=Yes, Automotive Grade="Grade 1", Category=Cap, ComponentLink2Description=Datasheet, ComponentLink2URL=https://api.kemet.com/component-edge/download/datasheet/C0603C100J5GACAUTO.pdf, Device Class L1="Passive Components", Device Class L2=Capacitors, Device Class L3="Ceramic Capacitors", Digikey Description="CAP CER 0.1UF 50V X7R 0603", Height=0.87mm, Lead Free=Yes, Manufacturer Part Number=C0603C104K5RACTU, Material=Ceramic, Octopart=https://octopart.com/c0603c104k5ractu-kemet-139244, RoHS=TRUE
C5: library part CMP-2000-05020-2, "CAP CER 100UF 16V X5R 1210", Capacitance=100uF, Manufacturer="Taiyo Yuden", Package=EMK325A-M, Temperature="-55°C to +85°C", Temperature Characteristic=X5R, Temperature Coefficient=15%, Temperature Range High=+85°C, Temperature Range Low=-55°C, Tolerance=20%, Voltage Rating=16V, Automotive=No, Category=Cap, ComponentLink2Description=Datasheet, ComponentLink2URL=https://www.yuden.co.jp/productdata/catalog/mlcc01_e.pdf, Device Class L1="Passive Components", Device Class L2=Capacitors, Device Class L3="Ceramic Capacitors", Digikey Description="CAP CER 100UF 16V X5R 1210", Height=2.8mm, Ipc Land Pattern Name=CAPC320250X250, Lead Free=Yes, Manufacturer Part Number=EMK325ABJ107MM-T, Material=Ceramic, Mouser Description="1210 100 uF 16 V ±20% Tolerance X5R SMT Multilayer Ceramic Capacitor", Octopart=https://octopart.com/emk325abj107mm-t-taiyo+yuden-20815747, RoHS=TRUE
C13 C14 C19 C20: library part CMP-13271-000211-1, "CL21 Series 0805 22uF 16V ±10% Tolerance X5R Multilayer Ceramic Chip Capacitor", Capacitance=22uF, Case/Package=0805, Max Operating Temperature=85°C, Min Operating Temperature=-55°C, Package Quantity=3000, Tolerance=10%, Voltage Rating=16V, Lead Free="Lead Free", Length=0.079inch, Mount="Surface Mount", Packaging="Tape and Reel", Thickness=0.055inch, Width=0.049inch
C15 C21: library part CMP-03422-000048-1, "CAP CER 0.1UF 16V X7R 0402", Capacitance="100 nF", Manufacturer=YAGEO, Package=CC0402, Temperature="-55°C to +125°C", Temperature Characteristic=X7R, Temperature Coefficient=30ppm/°C, Temperature Range High=+125°C, Temperature Range Low=-55°C, Tolerance=0.1, Voltage Rating="16 V", Automotive=No, Automotive Grade=NA, Category=Cap, ComponentLink2Description=Datasheet, ComponentLink2URL=http://www.yageo.com/documents/recent/UPY-GP_NP0_16V-to-50V_16.pdf, Device Class L1="Passive Components", Device Class L2=Capacitors, Device Class L3="Ceramic Capacitors", Digikey Description="CAP CER 0.1UF 16V X7R 0402", Footprint Url=http://www.yageo.com/exep/pages/download/literatures/UPY-C_GEN_24.pdf, Height=0.55mm, Ipc Land Pattern Name=CAPC10050X50, Lead Free=Yes, Manufacturer Part Number=CC0402KRX7R7BB104, Material=Ceramic, Mouser Description="0402 0.1 uF 16 V ±10 % Tolerance X7R SMT Multilayer Ceramic Capacitor", Octopart=https://octopart.com/cc0402krx7r7bb104-yageo-42244624, RoHS=TRUE
C16: library part CMP-2000-06362-2, "CAP CER 47UF 16V X5R 1210", Capacitance=47uF, Case Code (Imperial)=1210, Case Code (Metric)=3225, Dielectric=X5R, Max Operating Temperature=85°C, Min Operating Temperature=-55°C, Package Quantity=1, Tolerance=10%, Voltage=16V, Case/Package=1210, Depth=2.5mm, Height=2.5mm, Lead Free="Lead Free", Length=3.2mm, Material=Ceramic, Mount="Surface Mount", Number of Pins=2, Packaging="Cut Tape", Radiation Hardening=No, REACH SVHC="No SVHC", RoHS Compliant=Yes, Termination=SMD/SMT, Thickness=0.106inch, Voltage Rating=16V, Voltage Rating (DC)=16V, Width=0.098inch
C17 C22: library part CMP-2008-03723-3, "Ceramic Capacitor for Automotive 10nF ±10% 50VDC X7R 0402 Paper T/R", Capacitance=10nF, Case Code (Imperial)=0402, Case Code (Metric)=1005, Dielectric=X7R, Max Operating Temperature=125°C, Min Operating Temperature=-55°C, Package Quantity=1, Ratings=AEC-Q200, Tolerance=10%, Voltage=50V, Case/Package=0402, Depth=0.5mm, Height=0.5mm, Lead Free="Lead Free", Length=1mm, Mount="Surface Mount", Packaging="Tape and Reel", Radiation Hardening=No, REACH SVHC="No SVHC", Termination=SMD/SMT, Thickness=0.022inch, Voltage Rating=50V, Voltage Rating (DC)=50V, Width=0.02inch
C18: "Description", Manufacturer_Name=Samsung, Copyright="Copyright (C) 2025 Ultra Librarian. All rights reserved.", Manufacturer_Part_Number=CL32B226KAJNNNE, Supplier 1="Future Electronics", Supplier Part Number 1=CL32B226KAJNNNE
C23: library part CMP-13271-003516-1, "Cap Ceramic 22uF 10V X7R ±10% SMD 1206 +125°C Embossed T/R", Capacitance=22uF, Case Code (Imperial)=1206, Case Code (Metric)=3216, Dielectric=X7R, Max Operating Temperature=125°C, Min Operating Temperature=-55°C, Package Quantity=2000, Tolerance=10%, Voltage Rating=10V, Case/Package=1206, Contact Plating=Tin, Depth=1.6mm, Lead Free="Lead Free", Length=3.2mm, Mount="Surface Mount", Packaging="Tape and Reel", Radiation Hardening=No, Termination=Wraparound, Thickness=0.071inch, Voltage Rating (DC)=10V, Width=0.063inch
C24 C25 C26 C27 C29 C30 C31: library part CMP-13271-001069-1, "Cap Ceramic 100nF 10V X7R ±10% SMD 0402 +125°C Paper T/R", Capacitance=100nF, Case Code (Imperial)=0402, Case Code (Metric)=1005, Dielectric=X7R, Max Operating Temperature=125°C, Min Operating Temperature=-55°C, Package Quantity=1, Tolerance=10%, Voltage Rating=10V, Case/Package=0402, Contact Plating=Tin, Depth=0.5mm, Height=0.5mm, Length=1mm, Mount="Surface Mount", Packaging="Tape and Reel", Radiation Hardening=No, Thickness=0.022inch, Width=0.02inch
C28: library part CMP-2000-06336-1, "Chip Capacitor, 1 uF, +/- 10%, 10 V, -55 to 85 degC, 0603 (1608 Metric), RoHS, Tape and Reel", Capacitance=1uF, Capacitance - nF=1000nF, Case Code - in=0603, Case Code - mm=1608, Case Height=0.8mm, Case Length=1.6mm, Dielectric=X5R, Manufacturer=Murata, Maximum Operating Temperature=+85C, Minimum Operating Temperature=-55C, Operating Temperature Range=-55Cto+85C, Package / Case=0603(1608metric), Package Description="2-Pin Surface Mount Device, Body 1.6 x 0.8 mm", Temperature Coefficient / Code=+/-15%, Tolerance=10%, Voltage Rating=10V, Brand=MurataElectronics, Case Width=0.8mm, Datasheet URL=http://search.murata.co.jp/Ceramy/image/img/A01X/G101/ENG/GRM188R61A105KA61-01.pdf, Datasheet Version=02/2016, Dimensions=0.8mmWx1.6mmLx0.8mmH, Factory Pack Quantity=4000, Manufacturer URL=http://www.murata.com/, Mounting Technology=SurfaceMount, Package Reference=0603, Packaging=Reel, Product=GeneralTypeMLCCs, Product Category=MultilayerCeramicCapacitorsMLCC-SMD/SMT, RoHS=Details, Series=GRM, Termination Style=SMD/SMT, Type=GeneralPurposeMLCC, Voltage Rating DC=10V
C32: library part CMP-05428-000915-1, "Conductive Polymer Aluminum Solid Capacitors (OS-CON) 100uF ±20% 25V RADIAL SMT 8x6.9mm", Capacitance=100uF, Case/Package=Radial, ESR (Equivalent Series Resistance)=24mR, Leakage Current=500uA, Max Operating Temperature=105°C, Min Operating Temperature=-55°C, Package Quantity=1000, Ripple Current=3.2A, Tolerance=20%, Voltage=25V, Diameter=8mm, Dissipation Factor=12%, Height=6.9mm, Height - Seated (Max)=0.276inch, Lead Free="Lead Free", Length=6.9mm, Life (Hours)=5000Hour, Mount="Surface Mount", Number of Pins=7, Packaging="Tape and Reel", REACH SVHC="No SVHC", Ripple Current (AC)=3.2A, RoHS Compliant=Yes, Series="OS-CON, SVPF", Termination=SMD/SMT, Voltage Rating=25V, Voltage Rating (DC)=25V
C33: library part CMP-2000-06332-1, "Chip Capacitor, 10 nF, 16 V, 10%, -55 to 125 degC, 0402 (1005 Metric), RoHS, Tape and Reel", Capacitance=10000pF, Case Size/Dimension=0402, Dielectric=X7R, Manufacturer=Murata, Package Description="2-Pin Surface Mount Device, Body 1 x 0.5 mm", Rated Voltage=16V, Tolerance (%)=±10%, Datasheet URL=http://psearch.en.murata.com/capacitor/product/GRM155R71C103KA01%23.pdf, Datasheet Version=06/2016, Manufacturer URL=http://www.murata.com/, Mounting Technology=SurfaceMount, Package Reference=0402
C34: library part CMP-2000-06040-2, "Multilayer Ceramic Capacitors 2.2μF ±10% 50V X7R SMD 0805", Capacitance=2.2uF, Case Code (Imperial)=0805, Case Code (Metric)=2012, Dielectric=X7R, Dielectric Material=Ceramic, Max Operating Temperature=125°C, Min Operating Temperature=-55°C, Package Quantity=1, Tolerance=10%, Voltage=50V, Case/Package=0805, Construction=Flat, Contact Plating=Tin, Depth=1.25mm, Height=1.25mm, Lead Free="Lead Free", Length=2mm, Mount="Surface Mount", Packaging="Tape and Reel", Radiation Hardening=No, REACH SVHC="No SVHC", Resistor Type=Ceramic, RoHS Compliant=Yes, Series=C, Termination=SMD/SMT, Thickness=0.057inch, Voltage Rating=50V, Voltage Rating (DC)=50V, Weight=0.000194oz, Width=0.049inch
C35: library part CMP-08246-001769-2, "Multilayer Ceramic Capacitors 22uF ±20% 25V X7R SMD 1210", RoHS Compliant=Yes
C36: library part CMP-2006-02298-2, Manufacturer=Kemet, Part Number=C0603C105K4RACTU
F1: library part CMP-2000-05464-2, Color=Black, Current Rating=20A, Flammability Rating="UL94 V-0", Max Operating Temperature=145°C, Min Operating Temperature=-50°C, Voltage=500V, Approvals=UL, Body Material=Nylon, Contact Material=Brass, Contact Plating=Tin, Depth=6.73mm, Fuse Current=20A, Illumination Type=Illuminated, Lead Free="Lead Free", Length=16mm, Material="Brass, Nylon, Tin", Mount="PCB, Vertical", NexarPartId=8116161, Number of Circuits=1, Number of Poles=1, Orientation=Vertical, REACH SVHC="No SVHC", RoHS=Compliant, Termination="PC Pin", Voltage Rating (AC)=500V
I2C: library part CMP-1502-01078-4, "THT Vertical Pin Header WR-PHD, Pitch 2.54 mm, Dual Row, 8 pins", Color=Black, Contact Resistance=20mΩ, Current Rating=3A, Max Operating Temperature=105°C, Min Operating Temperature=-40°C, Operating Supply Voltage=250V, Connector Type="Male Pin", Contact Material=Gold, Contact Mating Length=5.9944mm, Contact Plating=Gold, Gender=Male, Height=8.89mm, Lead Free="Lead Free", Lead Pitch=2.54mm, Mount="Through Hole", Number of Contacts=8, Number of Pins=8, Number of Positions=8, Number of Rows=2, Orientation=Vertical, Packaging=Bulk, Pitch=2.54mm, RoHS=Compliant, Row Spacing=2.54mm, Termination=Solder, Voltage Rating=250V
"I/O & PWR": library part CMP-1502-01097-4, "THT Vertical Pin Header WR-PHD, Pitch 2.54 mm, Dual Row, 16 pins", Color=Black, Contact Resistance=20mΩ, Current Rating=3A, Max Operating Temperature=105°C, Min Operating Temperature=-40°C, Operating Supply Voltage=250V, Connector Type="Male Pin", Contact Material=Gold, Contact Mating Length=5.9944mm, Contact Plating=Gold, Gender=Male, Height=8.89mm, Lead Pitch=2.54mm, Mount="Through Hole", Number of Contacts=16, Number of Pins=16, Number of Positions=16, Number of Rows=2, Orientation=Vertical, Packaging=Bulk, Pitch=2.54mm, RoHS=Compliant, Row Spacing=2.54mm, Termination=Solder, Voltage Rating=250V
J1: "2~24 Poles, Screw Type, Horizontal, 5.08 Pitch, 26~14 (AWG), Terminal Block Connector", Package=None, Check_prices=https://www.snapeda.com/parts/TB006-508-02BE/Same+Sky/view-part/?ref=eda, MF="Same Sky", MP=TB006-508-02BE, SnapEDA_Link=https://www.snapeda.com/parts/TB006-508-02BE/Same+Sky/view-part/?ref=snap, Supplier 1="Arrow Electronics", Supplier Part Number 1=TB006-508-02BE
J2 J4: library part CMP-2000-05162-1, "Male Header, Pitch 2 mm, 1 x 2 Position, Height 6 mm, Tail Length 3.4 mm, -25 to 85 degC, RoHS, Bulk", Manufacturer=JST, Datasheet URL=http://datasheet.octopart.com/B2B-PH-K-S%28LF%29%28SN%29-JST-datasheet-8324864.pdf, Datasheet Version=Nov-08, Manufacturer URL=http://www.jst.com/home2.html, No of Positions=2, Pitch=2mm, Style/Orientation=StraightHeader/Plug, Termination=Crimp, Type=ShroudedHeader
J3: "USB CONN, 2.0 TYPE C, RCPT, 16POS, SMT; USB Connector Type:USB Type C; USB Standard:USB 2.0; Gender:Receptacle; No. of Positions:16Positions; Connector Mounting:Surface Mount, Through Hole Mount; Orientation:Right Angle RoHS Compliant: Yes", Package=None, Check_prices=https://www.snapeda.com/parts/USB4105GFA120/Global+Connector+Technology/view-part/?ref=eda, MF="Global Connector Technology", MP=USB4105GFA120, SnapEDA_Link=https://www.snapeda.com/parts/USB4105GFA120/Global+Connector+Technology/view-part/?ref=snap, Supplier 1=Newark, Supplier Part Number 1=USB4105-GF-A-120
J5 J6: library part CMP-1502-03324-3, "Terminal Block, 5MM Pitch, Horizontal, Pressure Clamp Glow Wire, Pcb, 2PINS, Gr", Current Rating=16A, Max Operating Temperature=120°C, Min Operating Temperature=-30°C, Voltage Rating=300V, Contact Material="Nickel, Tin", Height=11.6mm, Lead Pitch=5mm, Number of Contacts=2, Number of Pins=2, Number of Rows=1, Packaging=Box, RoHS=Compliant
JTAG UART: library part CMP-1502-01070-4, "THT Vertical Pin Header WR-PHD, Pitch 2.54 mm, Single Row, 6 pins", Color=Black, Contact Resistance=20mΩ, Current Rating=3A, Max Operating Temperature=105°C, Min Operating Temperature=-40°C, Operating Supply Voltage=250V, Connector Type="Male Pin", Contact Gender=Male, Contact Material=Gold, Contact Mating Length=5.9944mm, Contact Plating=Gold, Gender=Male, Height=8.89mm, Housing Material=PBT, Lead Free="Lead Free", Lead Pitch=2.54mm, Mount="Through Hole", Number of Contacts=6, Number of Pins=6, Number of Positions=6, Number of Rows=1, Orientation=Vertical, Packaging=Bulk, Pitch=2.54mm, RoHS=Compliant, Termination="Through Hole", Voltage Rating=250V
L1 L2: library part CMP-00260-130381681-1, "DFE322520F-2R2M=P2 Inductor Power Shielded Wirewound 2.2uH 20% 1MHz Metal 3.3A 0.04Ohm DCR 1210 T/R", Case/Package=1210, Inductance=2.2µH, Max Operating Temperature=125°C, Min Operating Temperature=-40°C, RMS Current (Irms)=3.3A, Saturation Current=4.4A, Series Resistance=40mΩ, Test Frequency=1MHz, Tolerance=20%, Composition=Wirewound, Height=2.8mm, Lifecycle Status=Production, NexarPartId=130381681
Q1 Q2: "P-Channel 40V 40A (Tc) 2.5W (Ta), 62.5W (Tc) Surface Mount TO-252, (D-Pak)", Package="TO-252 Alpha &amp; Omega Semiconductor", Supplier Part Number 1=785-1222-1-ND, Check_prices=https://www.snapeda.com/parts/AOD4185/Alpha+%2526+Omega+Semiconductor+Inc./view-part/?ref=eda, MF="Alpha &", MP=AOD4185, SnapEDA_Link=https://www.snapeda.com/parts/AOD4185/Alpha+%2526+Omega+Semiconductor+Inc./view-part/?ref=snap, Supplier 1=DigiKey
R1: library part CMP-2002-03895-1, Manufacturer="KOA Speer", Part Number=RK73H1ETTP3013F
R2: library part CMP-26527-000784-1, "102kΩ ±1% 0.1W 0603 Thick Film Chip Resistor AEC-Q200 compliant", Case Code (Imperial)=0603, Case Code (Metric)=1608, Max Operating Temperature=155°C, Max Power Dissipation=100mW, Min Operating Temperature=-55°C, Package Quantity=10000, Resistance=102kR, Resistor Type="Thick Film", Temperature Coefficient=100ppm/°C, Tolerance=1%, Case/Package=0603, Contact Plating=Tin, Features="Automotive AEC-Q200", Height=0.022inch, Lead Free="Lead Free", Length=0.061inch, Mount="Surface Mount", Number of Terminations=2, Packaging="Tape and Reel", Radiation Hardening=No, RoHS Compliant=Yes, Series=RMCF, Width=0.031inch
R3: library part CMP-2001-01136-1, Manufacturer=Yageo, Part Number=RC0805FR-07402KL
R4 R5: library part CMP-2002-07501-2, Case Code (Imperial)=0402, Case Code (Metric)=1005, Max Operating Temperature=155°C, Max Power Dissipation=63mW, Min Operating Temperature=-55°C, Power Rating=62.5mW, Resistance=20kΩ, Temperature Coefficient=100ppm/°C, Tolerance=1%, Voltage Rating=50V, Case/Package=0402, Composition="Thick Film", Depth=500µm, Features="Moisture Resistant", Height=350µm, Lead Free="Lead Free", Length=1mm, Military Standard=Not, NexarPartId=39794396, Number of Pins=2, Number of Terminations=2, Packaging="Tape & Reel", REACH SVHC="No SVHC", RoHS=Compliant, Schedule B="8533210045, 8533210045", Termination=SMD/SMT, Voltage Rating (DC)=50V, Width=500µm
R6 R8 R10: library part CMP-2000-03683-1, Manufacturer="Vishay Dale", Part Number=TNPU060349K9BZEN00
R7: library part CMP-04015-062765-1, "29.8kΩ ±0.1% 0.125W, 1/8W Chip Resistor 0805 (2012 Metric) Moisture Resistant Thin Film"
R9 R13 R32 R34: library part CMP-2002-04173-1, Manufacturer="KOA Speer", Part Number=RK73H1ETTP1003F
R11: library part CMP-2003-00793-2, Case Code (Imperial)=1206, Case Code (Metric)=3216, Max Operating Temperature=125°C, Max Power Dissipation=1W, Min Operating Temperature=-55°C, Resistance=20mΩ, Temperature Coefficient=50ppm/°C, Tolerance=1%, Case/Package=1206, Composition="Thick Film", Depth=1.6mm, Features="Automotive AEC-Q200", Height=750µm, Lead Free="Lead Free", Length=3.2004mm, Lifecycle Status=Production, Mount="Surface Mount", NexarPartId=24259294, Number of Terminations=2, Packaging="Cut Tape", Power Rating=1W, REACH SVHC="No SVHC", RoHS=Compliant, Schedule B="8533210045, 8533210045", Termination=Flat, Width=1.6002mm
R12 R16 R18 R21: library part CMP-26527-000128-1, "10kΩ ±1% 0.063W 0402 Thick Film Chip Resistor AEC-Q200 compliant", Case Code (Imperial)=0402, Case Code (Metric)=1005, Max Operating Temperature=155°C, Max Power Dissipation=63mW, Min Operating Temperature=-55°C, Power Rating=62.5mW, Resistance=10kR, Resistor Type="Thick Film", Temperature Coefficient=100ppm/°C, Tolerance=1%, Case/Package=0402, Construction=Rectangular, Contact Plating=Tin, Depth=0.5mm, Features="Automotive AEC-Q200", Height=0.016inch, Lead Free="Lead Free", Length=1mm, Military Standard=Not, Mount="Surface Mount", Number of Terminations=2, Packaging="Tape and Reel", Radiation Hardening=No, RoHS Compliant=Yes, Series=RMCF, Size Code=0402, Width=0.02inch
R14: library part CMP-2000-02157-2, "Automotive Metal Thin Film Chip Resistor, 0603, 27kΩ, 0.1%, 25ppm/°C, 0.1W, 100V", Case Code (Imperial)=0603, Case Code (Metric)=1608, Max Operating Temperature=155°C, Max Power Dissipation=100mW, Min Operating Temperature=-55°C, Package Quantity=1, Resistance=27kR, Resistor Type="Thin Film", Temperature Coefficient=25ppm/°C, Tolerance=0.1%, Voltage Rating=100V, Voltage Rating (DC)=75V, Case/Package=0603, Construction=Rectangular, Depth=0.8mm, Features="Automotive AEC-Q200", Height=0.02inch, Lead Free="Lead Free", Length=1.6mm, Military Standard=Not, Number of Terminations=2, Packaging="Tape and Reel", Power Rating=100mW, RoHS Compliant=Yes, Series=RG, Size Code=0603, Termination=SMD/SMT, Weight=7.1E-05oz, Width=0.031inch
R15 R29: library part CMP-2002-02915-2, "RES 10.0K OHM 1/16W .1% SMD 0402", Manufacturer=Yageo, Package=RT0402, Power Rating=0.063W, Resistance=10KΩ, Temperature="-55°C to +155°C", Temperature Coefficient="25 ppm/°C", Temperature Range High=+155°C, Temperature Range Low=-55°C, Tolerance=0.001, Voltage Rating=50V, Automotive=No, Category=Res, ComponentLink2Description=Datasheet, ComponentLink2URL=http://www.yageo.com/documents/recent/PYu-RT_1-to-0.01_RoHS_L_9.pdf, Composition="Thin Film", Device Class L1="Passive Components", Device Class L2=Resistors, Device Class L3="Chip SMD Resistors", Digikey Description="RES 10.0K OHM 1/16W .1% SMD 0402", Footprint Url=http://www.yageo.com/exep/pages/download/literatures/PYu-R_Mount_10.pdf, Height=0.35mm, Ipc Land Pattern Name=RESC10050X30, Lead Free=Yes, Manufacturer Part Number=RT0402BRD0710KL, Mouser Description="Thin Film Resistors - SMD 10K ohm 0.1% 1/16W", Octopart=https://octopart.com/rt0402brd0710kl-yageo-1181432, RoHS=TRUE, Series=RT
R17 R20: library part CMP-04015-027314-1, "130kΩ ±0.1% 0.063W, 1/16W Chip Resistor 0402 (1005 Metric) Moisture Resistant Thin Film"
R19: library part CMP-2002-02936-2, "RES SMD 20K OHM 0.1% 1/16W 0402", Manufacturer=Yageo, Package=RT0402, Power Rating=0.063W, Resistance=20KΩ, Temperature="-55°C to +155°C", Temperature Coefficient="25 ppm/°C", Temperature Range High=+155°C, Temperature Range Low=-55°C, Tolerance=0.001, Voltage Rating=50V, Automotive=No, Category=Res, ComponentLink2Description=Datasheet, ComponentLink2URL=http://www.yageo.com/documents/recent/PYu-RT_1-to-0.01_RoHS_L_9.pdf, Composition="Thin Film", Device Class L1="Passive Components", Device Class L2=Resistors, Device Class L3="Chip SMD Resistors", Digikey Description="RES SMD 20K OHM 0.1% 1/16W 0402", Footprint Url=http://www.yageo.com/exep/pages/download/literatures/PYu-R_Mount_10.pdf, Height=0.35mm, Ipc Land Pattern Name=RESC10050X30, Lead Free=Yes, Manufacturer Part Number=RT0402BRD0720KL, Mouser Description="Res Thin Film 0402 20K Ohm 0.1% 1/16W ±25ppm/°C Molded SMD SMD Paper T/R", Octopart=https://octopart.com/rt0402brd0720kl-yageo-1422805, RoHS=TRUE, Series=RT
R22: "41.7 kOhms Â±0.1% 0.1W, 1/10W Chip Resistor 0603 (1608 Metric) Thin Film", Package="1608 Yageo", Supplier Part Number 1=603-RT0603BRD0741K7L, Check_prices=https://www.snapeda.com/parts/RT0603BRD0741K7L/Yageo/view-part/?ref=eda, MF=Yageo, MP=RT0603BRD0741K7L, SnapEDA_Link=https://www.snapeda.com/parts/RT0603BRD0741K7L/Yageo/view-part/?ref=snap, Supplier 1=Mouser
R23 R24 R27 R28: library part CMP-03412-000619-1, "RES 10.0K OHM 1/10W .1% SMD 0603", Manufacturer=Yageo, Package=RT0603, Power Rating=0.1W, Resistance=10KΩ, Temperature="-55°C to +155°C", Temperature Coefficient="25 ppm/°C", Temperature Range High=+155°C, Temperature Range Low=-55°C, Tolerance=0.001, Voltage Rating=75V, Automotive=No, Category=Res, ComponentLink2Description=Datasheet, ComponentLink2URL=http://www.yageo.com/documents/recent/PYu-RT_1-to-0.01_RoHS_L_9.pdf, Composition="Thin Film", Device Class L1="Passive Components", Device Class L2=Resistors, Device Class L3="Chip SMD Resistors", Digikey Description="RES 10.0K OHM 1/10W .1% SMD 0603", Footprint Url=http://www.yageo.com/exep/pages/download/literatures/PYu-R_Mount_10.pdf, Height=0.55mm, Ipc Land Pattern Name=RESC16080X45, Lead Free=Yes, Manufacturer Part Number=RT0603BRD0710KL, Mouser Description="Thin Film Resistors - SMD 10K ohm 0.1% 1/10W", Octopart=https://octopart.com/rt0603brd0710kl-yageo-1399221, RoHS=TRUE, Series=RT
R25 R26: library part CMP-2002-08382-1, Manufacturer="Vishay Dale", Part Number=CRCW040222R0FKED
R30 R31: Package=None, Availability=Unavailable, MP=ERJB2CFR12V, Price=None, Supplier 1=Newark, Supplier Part Number 1=ERJB2CFR12V
R33: library part CMP-2002-03808-1, Manufacturer="KOA Speer", Part Number=RK73H1ETTP1001F
R35 R36: library part CMP-2002-07753-1, Manufacturer="Yageo / Phycomp", Part Number=RC0402FR-075K1L
SW1: library part CMP-1696-00002-1, "Slide Switch, 500 V, -20 to 70 degC, 3-Pin THD, RoHS", Case\Package=SOT-23-5, Dropout Voltage="300 mV", Max Input Voltage="8 V", Max Operating Temperature="85 degC", Max Ouput Current="150 mA", Max Power Dissipation="250 mW", Min Input Voltage="4.3 V", Min Operating Temperature="-40 degC", Nominal Output Voltage="3.3 V", Package Quantity=3000, ComponentLink1Description="Manufacturer URL", ComponentLink1URL=http://www.e-switch.ch/en/, ComponentLink2Description=Datasheet, ComponentLink2URL=https://www.e-switch.com/system/asset/product_line/data_sheet/119/EG.pdf, DatasheetVersion=Oct-15, Height="1.3 mm", Length="3 mm", Mount="Surface Mount", Output Current="150 mA", Output Voltage="3.3 V", Outputs=1, PackageDescription="3-Pin Through Hole Device, Body 11.6 x 4 mm, Pitch 2.5 mm", PackageReference=EG1218, Packaging="Tape and Reel", Pins=5, Power Rating="250 mW", Radiation Hardening=No, REACH SVHC="No SVHC", RoHSCompliant=true, Width="1.8 mm"
U1 U3: library part CMP-04910-000009-1, "PWR MGMT BATTERY MGMT", Manufacturer="Texas Instruments", Max Junction Temp=+125°C, Max Supply Voltage=22V, Min Supply Voltage=2.8V, Nominal Supply Current=300uA, Output Current=1.5-5.2A, Package=RUX0012A, Temperature="-40°C to +125°C", Temperature Range Low=-40°C, Automotive=No, Category=IC, ComponentLink2Description=Datasheet, ComponentLink2URL=https://www.ti.com/lit/ds/symlink/tps2121.pdf, Device Class L1="Integrated Circuits (ICs)", Device Class L2="Power Management ICs", Device Class L3=unset, Digikey Description="PWR MGMT BATTERY MGMT", Height=1mm, Lead Free=Yes, Manufacturer Part Number=TPS2121RUXR, Mouser Description="2.7-22V, 56m?, 4.5A, Priority Power MUX with Seamless Switchover 12-VQFN-HR -40 to 125", Number Of Outputs=1, Octopart=https://octopart.com/tps2121ruxr-texas+instruments-95511053, Output Voltage=22V, RoHS=TRUE, Standoff Height=0mm, Temperature Range High=+125°C
U2: library part CMP-0704-00005-3, "IC MONITOR PWR/CURR BIDIR 8-SOIC", Case/Package=SOIC, Input Offset Voltage (Vos)=40uV, Max Operating Temperature=125°C, Max Supply Voltage=5.5V, Min Operating Temperature=-40°C, Min Supply Voltage=3V, Nominal Supply Current=1mA, Output Current=10mA, Package Quantity=1, Quiescent Current=700uA, Accuracy=0.5%, Bandwidth=11kHz, Common Mode Rejection Ratio=100dB, Contact Plating=Gold, Lead Free="Lead Free", Number of Amplifiers=1, Number of Pins=8, Packaging="Tape and Reel", Radiation Hardening=No, REACH SVHC="No SVHC", RoHS Compliant=Yes, Series=Zero-Drift, Supply Current=1mA